# Altium PCB Urukul.PcbDoc (part 14 of 15)
Units mm, origin at the board's own origin, x right, y up, seen from the top; angles counter-clockwise.
Board outline 161.99 x 100 mm, 6 copper layers (L1, L2, L3, L4, P5, L6), stack 1.548 mm thick; 1078 components, 609 nets, 3798 pads, 2552 vias.
Unrouted connection lines stored in the file: 1.
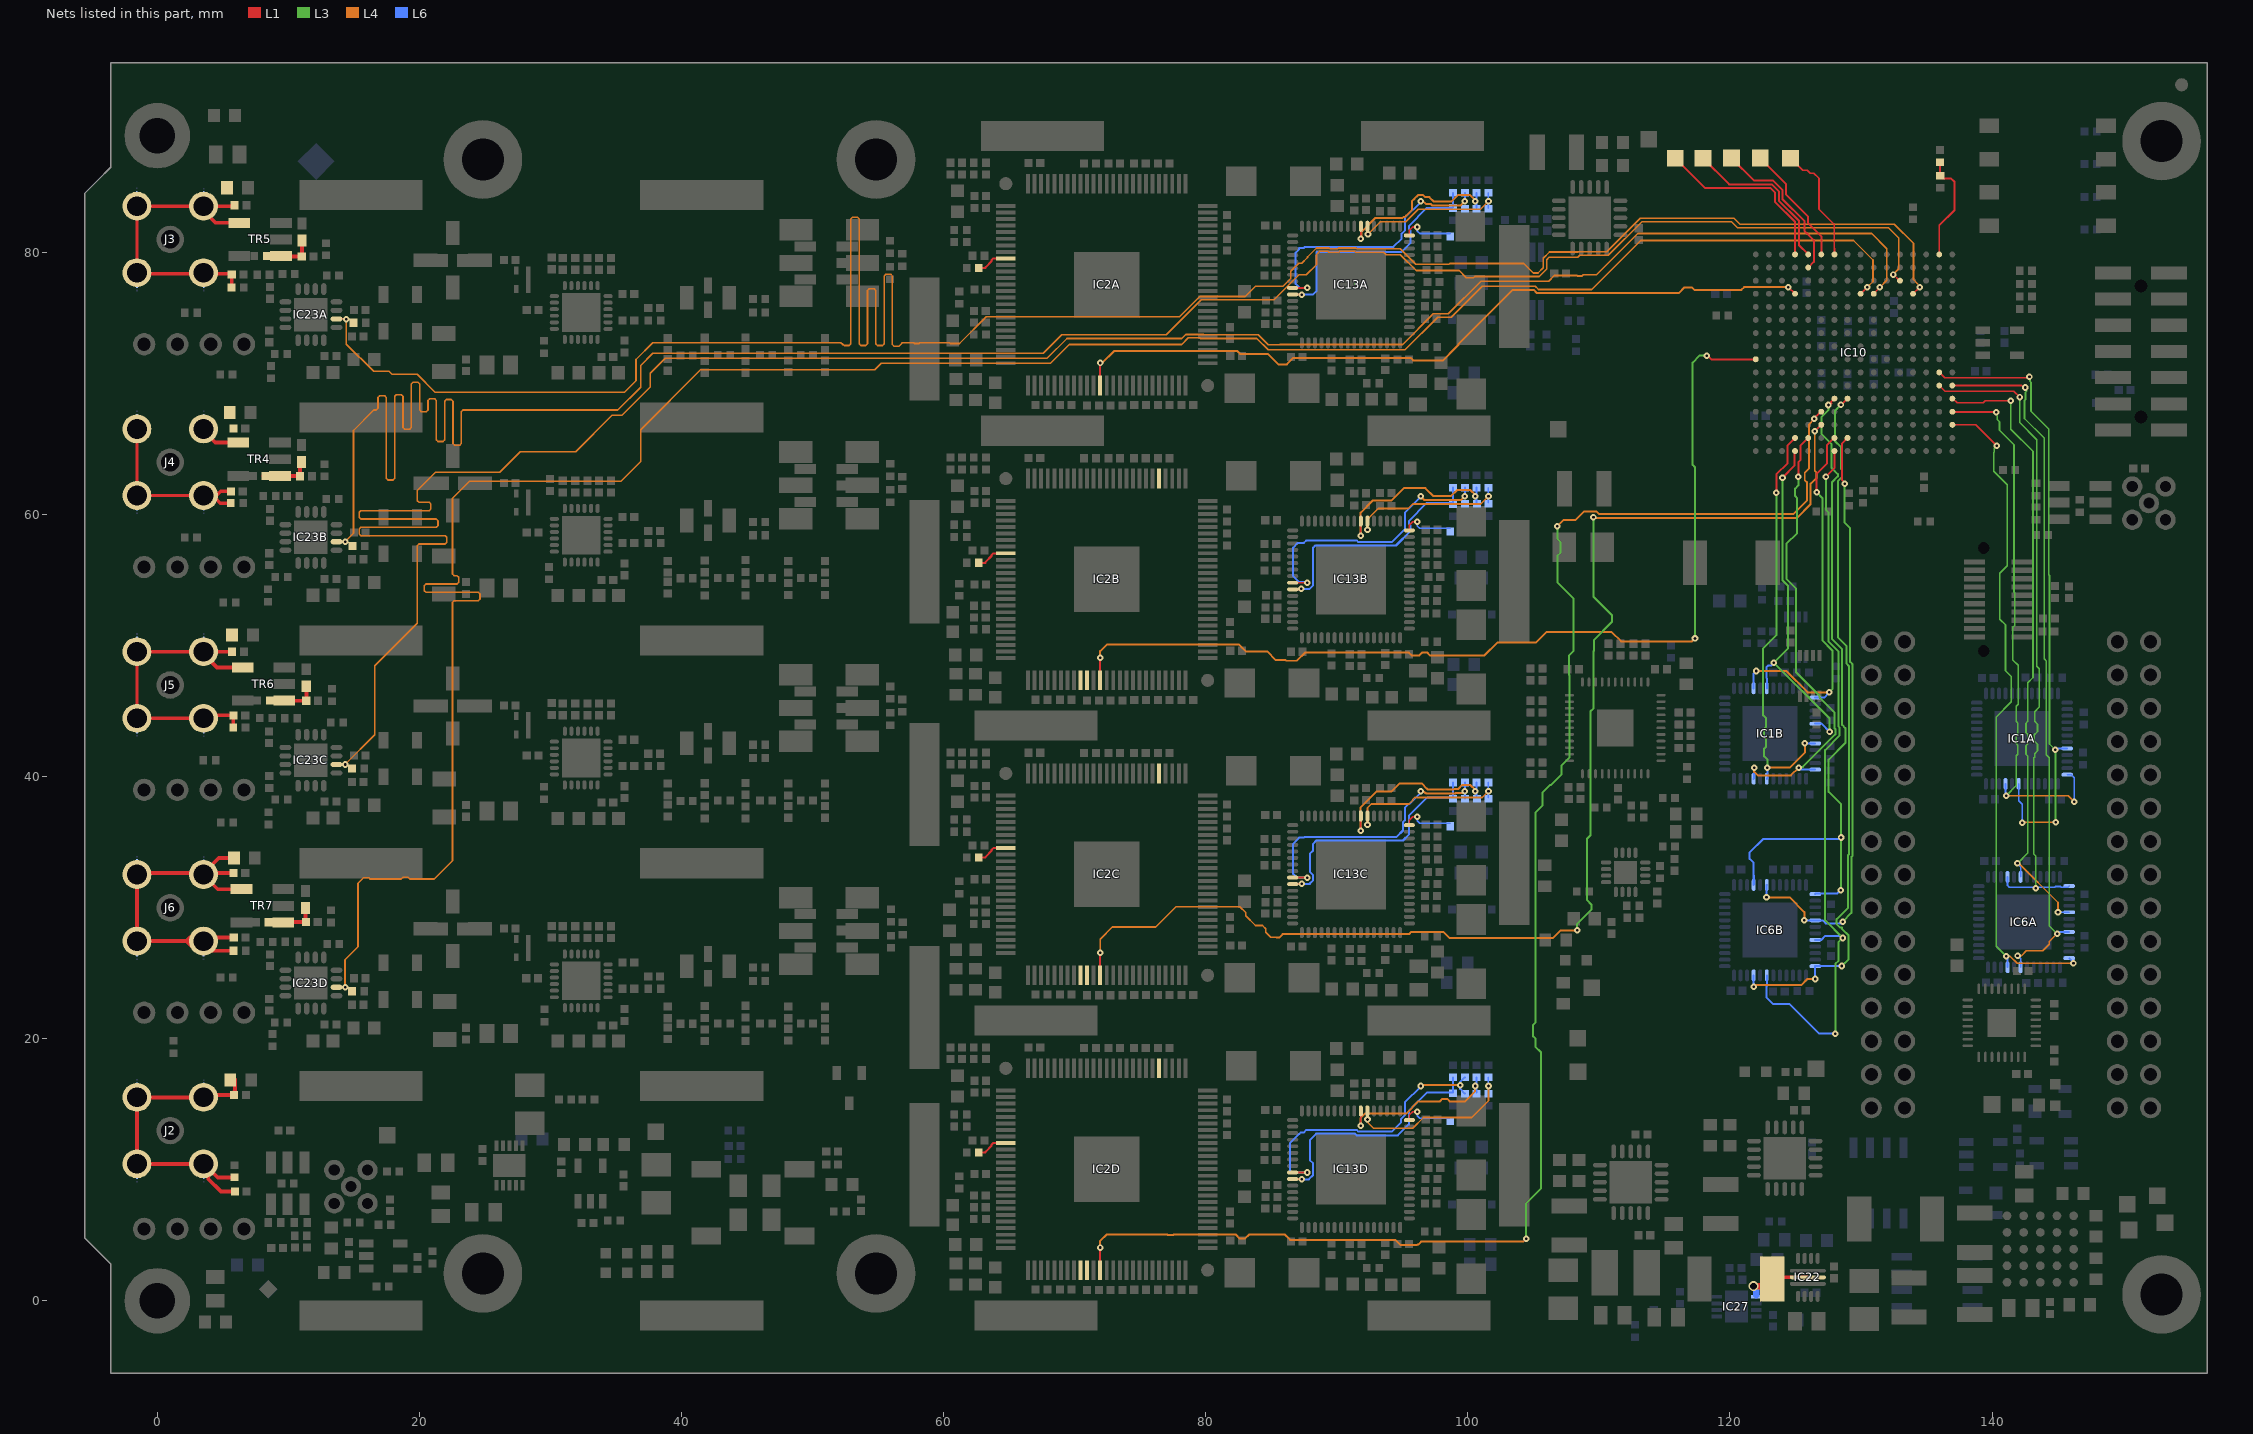
[diagram p16: the nets of this part, all layers, seen from the top]

## Via types
v1: diameter 0.5, hole 0.2, L1 to L6, tented both sides, 1964 vias
v2: diameter 0.5, hole 0.2, L1 to L6, 480 vias
v3: diameter 0.6, hole 0.3, L1 to L6, tented both sides, 52 vias
v4: diameter 0.6, hole 0.3, L1 to L6, 36 vias
v5: diameter 0.762, hole 0.508, L1 to L6, tented both sides, 20 vias

## Nets (pads, with @x,y where several pads share a name; then routed paths per layer and width w, separated by ;. In a path a pad name is that pad's centre, name@x,y a point inside that pad or via, vN(x,y) a via of type N, cw(c..) or ccw(c..) an arc to the next point about the centre after c; other vN are vias at no path point) (continued)
R\E\_DE2: IC1A.8 IC1A.19 IC10.K15 | length 48.5
  L1 w0.127: IC10.K15@135.97,70.841 136.386,70.425 142.679,70.425 142.752,70.498 v1(142.853,70.498)
  L3 w0.127: v1(142.853,70.498) 142.889,70.462 142.889,70.165 142.974,70.08 142.974,67.88 144.329,66.526 144.329,55.391 144.381,55.338 144.381,42.489 144.84,42.029 144.84,36.539 v1(144.859,36.52)
  L4 w0.127: v1(142.294,36.488) 142.326,36.52 v1(144.859,36.52)
  L6 w0.127: IC1A.19@142.031,39.446 142.031,38.156 142.294,37.893 v1(142.294,36.488) ; v1(144.821,42.048) 144.919,42.146 IC1A.8@145.731,42.146
R\E\_DE3: IC1A.12 IC1A.21 IC10.N16 | length 42.8
  L1 w0.127: IC10.N16@136.97,67.841 136.995,67.816 140.295,67.816 v1(140.321,67.79)
  L3 w0.127: v1(140.321,67.79) 140.389,67.722 140.389,67.254 140.572,67.071 140.572,66.433 141.672,65.333 141.672,54.075 141.726,54.021 141.726,51.525 141.59,51.389 141.59,48.893 141.996,48.487 141.996,45.515 141.841,45.36 141.841,44.213 141.972,44.082 141.972,43.273 141.841,43.142 141.841,42.523 141.972,42.392 141.972,41.709 141.841,41.578 141.841,39.318 v1(141.071,38.548)
  L4 w0.127: v1(141.071,38.548) 145.804,38.548 v1(146.281,38.071)
  L6 w0.127: IC1A.21@141.031,39.446 141.031,38.588 v1(141.071,38.548) ; IC1A.12@145.731,40.146 146.056,40.146 146.281,39.921 v1(146.281,38.071)
R\E\_DE4: IC6A.1 IC6A.40 IC10.L15 | length 50.7
  L1 w0.127: IC10.L15@135.97,69.841 136.406,69.405 141.659,69.405 v1(142.105,68.96)
  L3 w0.127: v1(142.105,68.96) 142.105,67.017 143.42,65.701 143.42,48.421 143.602,48.239 143.602,45.311 143.246,44.955 143.246,44.213 143.472,43.987 143.472,43.434 143.225,43.187 143.225,42.713 143.472,42.466 143.472,41.963 143.246,41.737 143.246,41.483 143.191,41.428 143.191,34.088 143.335,33.944 v1(143.335,31.465)
  L6 w0.127: IC6A.40@141.181,32.346 141.181,31.683 141.186,31.683 141.321,31.548 v1@143.321,31.548 ; v1@143.335,31.548 144.776,31.548 144.839,31.611 145.224,31.611 145.287,31.548 145.784,31.548 IC6A.1@145.881,31.646
R\E\_DE5: IC6A.5 IC6A.42 IC10.M16 | length 48.5
  L1 w0.127: IC10.M16@136.97,68.841 137.018,68.841 137.34,68.52 139.318,68.52 139.48,68.681 v1(141.43,68.681)
  L3 w0.127: v1(141.43,68.681) 141.43,66.514 143.123,64.822 143.123,47.556 142.721,47.154 142.721,45.311 ; v1(141.938,33.396) 141.954,33.396 142.734,34.176 142.734,41.566 142.591,41.709 142.591,42.36 142.722,42.491 142.722,43.221 142.591,43.352 142.591,44.082 142.722,44.213 142.722,45.311
  L4 w0.127: v1(141.938,33.396) 142.028,33.396 145.031,30.392 v1(145.031,29.646)
  L6 w0.127: v1(141.938,33.396) 141.938,33.345 142.181,33.102 IC6A.42@142.181,32.346 ; v1(145.031,29.646) IC6A.5@145.881,29.646
R\E\_DE6: IC6A.8 IC6A.19 IC10.L16 | length 54.3
  L1 w0.127: IC10.L16@136.97,69.841 142.278,69.841 142.43,69.688 v1(142.531,69.688)
  L3 w0.127: v1(142.531,69.688) 142.531,69.587 142.64,69.479 142.64,69.433 142.545,69.338 142.545,68.778 142.472,68.704 142.472,67.329 143.97,65.83 143.97,48.979 144.127,48.823 144.127,41.673 144.372,41.428 144.372,28.594 v1(144.96,28.006)
  L4 w0.127: v1(141.944,26.341) 142.251,26.341 142.617,26.708 143.866,26.708 144.372,27.213 144.372,27.418 v1(144.96,28.006)
  L6 w0.127: v1(141.944,26.341) 142.181,26.103 IC6A.19@142.181,25.446 ; v1(144.96,28.006) 144.96,28.035 145.071,28.146 IC6A.8@145.881,28.146
R\E\_DE7: IC6A.12 IC6A.21 IC10.P16 | length 51.7
  L1 w0.127: IC10.P16@136.97,66.841 138.745,66.841 v1(140.346,65.24)
  L3 w0.127: v1(140.346,65.24) 140.169,65.064 140.169,64.769 140.123,64.723 140.123,63.306 141.164,62.265 141.164,56.083 140.591,55.51 140.591,52.012 141.026,51.577 141.026,48.078 141.472,47.632 141.472,45.709 140.316,44.553 140.316,27.054 v1(141.071,26.298)
  L4 w0.127: v1(141.071,26.298) 141.363,26.298 141.914,25.748 146.202,25.748 v1(146.21,25.756)
  L6 w0.127: v1(141.071,26.298) 141.181,26.188 IC6A.21@141.181,25.446 ; IC6A.12@145.881,26.146 146.21,25.817 v1(146.21,25.756)
R\E\_DE8: IC1B.1 IC1B.40 IC10.R7 | length 29.5
  L1 w0.152: v1(126.613,61.689) 126.613,63.093 127.398,63.878 127.398,65.269 IC10.R7@127.97,65.841
  L3 w0.152: v1(126.613,61.689) 127.046,61.256 127.046,60.241 127.051,60.236 127.051,50.391 127.821,49.621 127.821,46.671 v1(127.583,46.432)
  L4 w0.152: v1(122.008,48.057) 124.305,48.057 125.93,46.432 v1(127.583,46.432)
  L6 w0.152: IC1B.40@121.808,46.732 121.808,47.857 v1(122.008,48.057) ; IC1B.1@126.508,46.032 127.183,46.032 v1(127.583,46.432)
R\E\_DE9: IC1B.5 IC1B.42 IC10.T4 | length 27.9
  L1 w0.152: v1(124.01,62.811) 124.94,63.742 124.94,64.811 IC10.T4@124.97,64.841
  L3 w0.152: v1(124.01,62.811) 124.01,54.994 124.423,54.58 124.423,49.76 v1(123.348,48.685) 127.598,44.435 v1(127.598,43.435)
  L6 w0.152: IC1B.42@122.808,46.732 122.808,47.489 122.77,47.527 122.77,48.336 122.903,48.47 123.133,48.47 v1(123.348,48.685) ; IC1B.5@126.508,44.032 127,44.032 v1(127.598,43.435)
R\E\_DE10: IC1B.8 IC1B.19 IC10.R4 | length 32.2
  L1 w0.152: v1(123.545,61.648) 123.545,63.066 124.398,63.919 124.398,65.269 IC10.R4@124.97,65.841
  L3 w0.152: v1(122.848,40.685) 122.848,41.307 122.605,41.55 122.605,42.139 122.761,42.295 122.761,42.845 122.605,43.001 122.605,43.641 122.761,43.798 122.761,44.438 122.533,44.666 122.533,49.781 123.545,50.793 v1(123.545,61.648)
  L4 w0.152: v1(122.848,40.685) 124.564,40.685 125.708,41.828 v1(125.708,42.54)
  L6 w0.152: IC1B.19@122.808,39.832 122.848,39.872 v1(122.848,40.685) ; v1@125.75,42.532 IC1B.8@126.508,42.532
R\E\_DE11: IC1B.12 IC1B.21 IC10.R5 | length 35.1
  L1 w0.152: v1(125.22,62.89) 125.22,63.997 125.398,64.175 125.398,65.269 IC10.R5@125.97,65.841
  L3 w0.152: v1(125.22,62.89) 125.22,62.229 124.967,61.976 124.967,61.409 125.123,61.253 125.123,58.583 124.305,57.764 124.305,55.094 125.055,54.344 125.055,47.942 126.845,46.151 126.845,46.032 127.994,44.883 127.994,43.679 128.051,43.622 128.051,43.228 125.566,40.742 125.308,40.742 v1(125.251,40.685)
  L4 w0.152: v1(121.848,40.685) 121.848,40.366 122.125,40.088 124.653,40.088 v1(125.251,40.685)
  L6 w0.152: IC1B.21@121.808,39.832 121.848,39.872 v1(121.848,40.685) ; v1(125.251,40.685) 125.404,40.532 IC1B.12@126.508,40.532
R\E\_DE12: IC6B.1 IC6B.40 IC10.M7 | length 53.1
  L1 w0.152: v1@127.73,68.476 127.607,68.353 v1(127.515,68.353) 127.515,68.37 127.97,68.824 IC10.M7@127.97,68.841
  L3 w0.152: v1(127.515,68.353) 127.515,67.965 126.968,67.417 126.968,66.153 127.766,65.355 127.766,63.548 128.231,63.082 128.231,62.917 127.795,62.48 127.795,50.486 128.556,49.725 128.556,43.944 128.803,43.697 128.803,42.561 127.537,41.295 127.537,38.831 128.476,37.891 v1(128.476,35.351) 128.476,31.364 v1(128.451,31.338)
  L6 w0.152: IC6B.1@126.508,31.032 126.56,31.084 128.197,31.084 v1(128.451,31.338) ; v1(128.476,35.351) 128.364,35.239 122.524,35.239 121.505,34.22 121.505,33.73 121.808,33.427 121.808,32.475 ; 121.808,32.475 IC6B.40@121.808,31.732 121.848,31.772 121.848,32.435 121.808,32.475
R\E\_DE13: IC6B.5 IC6B.42 IC10.R8 | length 45.7
  L1 w0.152: v1(128.745,62.34) 128.745,62.434 128.542,62.637 128.542,65.413 IC10.R8@128.97,65.841
  L3 w0.152: v1(128.598,28.935) 129.268,29.605 129.268,33.863 129.361,33.956 129.361,48.551 129.163,48.75 129.163,58.959 128.745,59.377 v1(128.745,62.34)
  L4 w0.152: v1(122.787,30.779) 124.565,30.779 125.682,29.662 v1(125.682,29.052)
  L6 w0.152: v1(122.787,30.779) 122.787,31.711 IC6B.42@122.808,31.732 ; v1(125.682,29.052) 125.703,29.032 IC6B.5@126.508,29.032 127.065,29.032 127.303,28.794 128.457,28.794 v1(128.598,28.935)
R\E\_DE14: IC6B.8 IC6B.19 IC10.T7 | length 56.8
  L1 w0.152: v1(127.325,62.89) 127.97,63.535 IC10.T7@127.97,64.841
  L3 w0.152: v1(127.325,62.89) 127.325,60.357 127.515,60.167 127.515,50.322 128.276,49.561 128.276,43.828 128.356,43.749 128.356,43.121 127.257,42.022 127.257,29.025 v1(128.598,27.685) 128.299,27.385 128.299,25.959 128.045,25.705 v1(128.045,20.387)
  L6 w0.152: IC6B.19@122.808,24.832 122.808,24.039 122.77,24.001 122.77,23.147 123.265,22.651 124.539,22.651 126.804,20.387 v1(128.045,20.387) ; IC6B.8@126.508,27.532 126.965,27.532 127.278,27.845 128.437,27.845 v1(128.598,27.685)
R\E\_DE15: IC6B.12 IC6B.21 IC10.M8 | length 54.3
  L1 w0.152: v1(128.47,68.363) 128.481,68.363 128.959,68.841 IC10.M8@128.97,68.841
  L3 w0.152: v1(128.47,68.363) 128.017,67.91 128.017,65.582 128.476,65.122 128.476,63.471 128.535,63.412 128.535,62.826 128.238,62.528 128.238,50.627 128.883,49.981 128.883,48.634 129.082,48.435 129.082,34.072 128.988,33.978 128.988,29.966 128.145,29.122 128.145,28.747 128.41,28.481 128.565,28.481 128.565,28.359 129.051,27.872 129.051,26.071 v1(128.527,25.547)
  L4 w0.152: v1(121.822,23.972) 121.941,24.092 125.432,24.092 125.897,24.556 v1(126.521,24.556)
  L6 w0.152: IC6B.21@121.808,24.832 121.808,23.975 v1@121.848,23.935 ; v1@126.508,24.556 IC6B.12@126.508,25.532 v1@128.527,25.532
RF_OUT0: C50A.2 D2A.2 R180.2 R192A.2 TR5.3 | length 4
  L1 w0.298: R180.2@8.339,79.731 8.389,79.68 TR5.3@9.44,79.68 ; TR5.3@9.44,79.718 9.478,79.68 C50A.2@11.019,79.68 11.044,79.705 D2A.2@11.044,80.913
RF_OUT1: C50B.2 D2B.2 R179.2 R192B.2 TR4.3 | length 3.9
  L1 w0.298: R179.2@8.108,62.943 TR4.3@9.359,62.943 10.864,62.943 C50B.2@10.894,62.913 10.894,63.899 D2B.2@10.999,64.004
RF_OUT2: C50C.2 D2C.2 R181.2 R192C.2 TR6.3 | length 3.9
  L1 w0.298: R181.2@8.578,45.793 8.583,45.788 R192C.2@11.349,45.788 C50C.2@11.369,45.788 D2C.2@11.369,46.891
RF_OUT3: C50D.2 D2D.2 R182.2 R192D.2 TR7.3 | length 3.9
  L1 w0.298: R182.2@8.481,28.881 8.513,28.913 R192D.2@11.324,28.913 C50D.2@11.344,28.913 11.319,28.938 D2D.2@11.319,29.963
RFSW_CTRL0: IC10.D13 IC23A.2 R20A.2 | length 176.2
  L1 w0.127: IC23A.2@13.673,74.924 14.408,74.924 v1(14.427,74.905) ; IC10.D13@133.97,76.841 133.97,76.846 134.47,77.346 v1(134.47,77.35)
  L4 w0.127: v1(14.427,74.905) 14.427,73 16.51,70.917 17.678,70.917 17.907,70.688 19.837,70.688 21.191,69.335 35.654,69.335 36.525,70.206 36.525,71.831 37.795,73.101 39.694,73.101 40.257,73.101 ; 39.976,73.101 40.257,73.101 ; 52.282,72.974 52.155,73.101 50.401,73.101 40.257,73.101 ; 52.282,72.985 52.282,73.012 ; 52.282,73.022 52.409,72.895 52.79,72.895 52.917,73.022 52.917,73.101 52.917,82.548 53.044,82.675 53.425,82.675 53.552,82.548 53.552,73.101 53.552,73.022 53.679,72.895 54.06,72.895 54.187,73.022 54.187,73.101 54.187,77.088 54.314,77.215 54.695,77.215 54.822,77.088 54.822,73.101 54.822,73.022 54.949,72.895 55.33,72.895 55.457,73.022 55.457,73.101 55.457,78.196 55.584,78.323 55.965,78.323 56.092,78.196 56.092,73.101 56.092,72.974 56.219,72.847 56.6,72.847 56.727,72.974 56.854,73.101 57.044,73.101 57.163,73.101 57.708,73.101 57.762,73.048 58.126,73.048 58.18,73.101 60.447,73.101 60.501,73.048 61.211,73.048 63.246,75.082 78,75.082 79.549,76.632 83.007,76.632 83.799,77.423 85.899,77.423 86.487,78.012 86.487,78.562 87.103,79.179 87.332,79.179 87.759,79.606 87.759,79.648 88.446,80.335 89.424,80.335 89.483,80.276 90.059,80.276 90.118,80.335 91.478,80.335 91.539,80.274 94.846,80.274 96.033,79.087 98.557,79.087 98.616,79.146 104.275,79.146 104.99,78.432 105.355,78.432 105.756,78.833 105.756,79.547 106.232,80.023 108.408,80.023 108.421,80.035 110.598,80.035 113.164,82.602 120.303,82.602 120.765,82.14 132.548,82.14 133.999,80.689 133.999,77.924 134.337,77.586
RFSW_CTRL1: IC10.C12 IC23B.2 R20B.2 | length 175.5
  L1 w0.127: v1(132.458,78.309) 132.48,78.309 132.948,77.841 IC10.C12@132.97,77.841
  L4 w0.127: v1(14.327,57.924) 14.969,58.566 14.969,66.413 16.526,67.97 16.717,67.97 16.844,68.097 16.844,68.923 16.971,69.05 17.352,69.05 17.479,68.923 17.479,67.97 17.479,62.756 17.606,62.629 17.987,62.629 18.114,62.756 18.114,67.97 18.114,69.02 18.241,69.147 18.622,69.147 18.749,69.02 18.749,67.97 18.749,66.642 18.876,66.515 19.257,66.515 19.384,66.642 19.384,67.97 19.384,69.961 19.511,70.088 19.892,70.088 20.019,69.961 20.019,67.97 20.146,67.843 20.527,67.843 20.654,67.97 20.654,68.696 20.781,68.823 21.162,68.823 21.289,68.696 21.289,67.97 21.289,65.692 21.416,65.565 21.797,65.565 21.924,65.692 21.924,67.97 21.924,68.648 22.051,68.775 22.432,68.775 22.559,68.648 22.559,67.97 22.559,65.418 22.686,65.291 23.067,65.291 23.194,65.418 23.194,67.843 23.321,67.97 25.357,67.97 35.143,67.97 36.881,69.708 36.881,71.374 37.798,72.291 67.597,72.291 69.017,73.711 76.987,73.711 79.654,76.378 85.212,76.378 87.117,78.283 87.664,78.283 88.446,79.065 88.446,79.827 88.7,80.081 89.319,80.081 89.378,80.022 90.164,80.022 90.223,80.081 91.373,80.081 91.433,80.02 93.587,80.02 93.78,79.827 94.852,79.827 96.066,78.613 99.343,78.613 99.885,78.071 100.436,78.071 100.521,78.156 105.438,78.156 106.01,78.728 106.01,79.442 106.197,79.629 108.382,79.629 108.534,79.781 110.718,79.781 113.285,82.348 120.116,82.348 120.577,81.886 132.093,81.886 132.888,81.091 132.888,78.755 132.458,78.324 v1(132.458,78.309)
RFSW_CTRL2: IC10.D10 IC23C.2 R20C.2 | length 175.6
  L1 w0.127: IC10.D10@130.97,76.841 130.97,76.859 131.444,77.333 v1(131.444,77.35)
  L4 w0.127: v1(14.327,40.924) 16.586,43.183 16.586,48.449 19.837,51.7 19.837,54.216 19.837,57.62 19.964,57.747 21.963,57.747 22.09,57.874 22.09,58.255 21.963,58.382 19.837,58.382 15.535,58.382 15.408,58.509 15.408,58.89 15.535,59.017 19.837,59.017 21.295,59.017 21.422,59.144 21.422,59.525 21.295,59.652 19.837,59.652 15.535,59.652 15.408,59.779 15.408,60.16 15.535,60.287 19.837,60.287 20.75,60.287 20.877,60.414 20.877,60.795 20.75,60.922 19.964,60.922 19.837,61.049 19.837,61.239 19.837,61.83 21.228,63.221 26.124,63.221 27.694,64.791 31.923,64.791 34.696,67.564 35.458,67.564 37.617,69.723 37.617,70.764 38.763,71.91 67.892,71.91 69.413,73.431 78.174,73.431 78.475,73.733 79.859,73.733 79.886,73.705 84.001,73.705 84.759,72.948 85.626,72.948 85.648,72.969 95.025,72.969 97.361,75.306 98.504,75.306 100.999,77.8 106.169,77.8 106.601,78.232 108.327,78.232 108.362,78.198 108.726,78.198 108.815,78.286 109.813,78.286 112.966,81.44 130.808,81.44 131.971,80.277 131.971,77.877 v1(131.444,77.35)
RFSW_CTRL3: IC10.D9 IC23D.2 R20D.2 | length 175.5
  L1 w0.127: IC10.D9@129.97,76.841 129.972,76.841 130.468,77.337 v1(130.47,77.337)
  L4 w0.127: v1(14.327,23.924) 14.327,26.032 15.316,27.022 15.316,31.86 15.734,32.279 16.126,32.279 16.223,32.182 18.615,32.182 18.762,32.329 19.126,32.329 19.273,32.182 21.133,32.182 22.53,33.579 22.53,51.966 22.53,53.302 22.657,53.429 24.501,53.429 24.628,53.556 24.628,53.937 24.501,54.064 22.53,54.064 20.504,54.064 20.377,54.191 20.377,54.572 20.504,54.699 22.53,54.699 22.865,54.699 22.992,54.826 22.992,55.207 22.865,55.334 22.657,55.334 22.53,55.461 22.53,55.651 22.53,61.239 23.825,62.535 35.382,62.535 36.884,64.037 36.884,66.475 41.45,71.041 54.749,71.041 55.237,71.529 68.15,71.529 69.596,72.974 78.157,72.974 78.662,73.479 79.536,73.479 79.589,73.426 83.899,73.426 84.763,72.562 95.202,72.562 97.692,75.052 98.733,75.052 101.089,77.407 105.143,77.407 105.388,77.162 109.443,77.162 113.187,80.906 129.429,80.906 130.911,79.425 130.911,77.778 v1(130.47,77.337)
RSET1A: IC2A.84 R112A.1 | length 2.4
  L1 w0.152: R112A.1@62.689,78.813 63.199,78.813 63.199,78.881 63.652,79.334 63.652,79.399 63.794,79.541 IC2A.84@64.744,79.541
RSET1B: IC2B.84 R112B.1 | length 2.4
  L1 w0.152: R112B.1@62.689,56.313 63.199,56.313 63.199,56.381 63.652,56.834 63.652,56.899 63.794,57.041 IC2B.84@64.744,57.041
RSET1C: IC2C.84 R112C.1 | length 2.4
  L1 w0.152: R112C.1@62.689,33.813 63.199,33.813 63.199,33.881 63.652,34.334 63.652,34.399 63.794,34.541 IC2C.84@64.744,34.541
RSET1D: IC2D.84 R112D.1 | length 2.4
  L1 w0.152: R112D.1@62.689,11.313 63.199,11.313 63.199,11.381 63.652,11.834 63.652,11.899 63.794,12.041 IC2D.84@64.744,12.041
RSETA: IC13A.48 R15A.1 | length 4
  L1 w0.127: IC13A.48@95.534,81.291 95.534,81.678 95.791,81.935 v1(96.139,81.935)
  L6 w0.127: v1(96.139,81.935) 96.139,81.619 96.319,81.438 R15A.1@98.649,81.438
RSETB: IC13B.48 R15B.1 | length 4
  L1 w0.127: IC13B.48@95.534,58.791 95.534,59.178 95.791,59.435 v1(96.139,59.435)
  L6 w0.127: v1(96.139,59.435) 96.139,59.119 96.319,58.938 R15B.1@98.649,58.938
RSETC: IC13C.48 R15C.1 | length 4
  L1 w0.127: IC13C.48@95.534,36.291 95.534,36.678 95.791,36.935 v1(96.139,36.935)
  L6 w0.127: v1(96.139,36.935) 96.139,36.619 96.319,36.438 R15C.1@98.649,36.438
RSETD: IC13D.48 R15D.1 | length 4
  L1 w0.127: IC13D.48@95.534,13.791 95.534,14.178 95.791,14.435 v1(96.139,14.435)
  L6 w0.127: v1(96.139,14.435) 96.139,14.119 96.319,13.938 R15D.1@98.649,13.938
S1A: IC13A.9 R96A.1 R104A.2 | length 20.9
  L1 w0.152: IC13A.9@86.634,77.291 87.741,77.291 v1(87.744,77.288)
  L4 w0.152: v1(96.393,83.891) 96.494,83.992 96.792,83.694 97.15,83.694 97.266,83.579 98.773,83.579 98.784,83.59 99.468,83.59 v1(99.769,83.891)
  L6 w0.152: v1(87.744,77.288) 87.178,77.288 86.866,77.601 86.866,79.976 87.106,80.216 87.106,80.335 87.482,80.335 87.566,80.419 94.322,80.419 94.944,81.041 94.944,81.423 95.187,81.666 95.187,82.634 96.393,83.84 v1(96.393,83.891) ; v1(99.769,83.891) R104A.2@99.769,84.548
S1B: IC13B.9 R96B.1 R104B.2 | length 21.1
  L1 w0.152: IC13B.9@86.634,54.791 87.741,54.791 v1(87.744,54.788)
  L4 w0.152: v1(96.393,61.391) 96.693,61.09 99.468,61.09 v1(99.769,61.391)
  L6 w0.152: v1(87.744,54.788) 87.697,54.835 87.131,54.835 86.668,55.299 86.668,57.475 87.028,57.835 87.482,57.835 87.654,58.008 91.534,58.008 91.631,57.91 94.224,57.91 95.187,58.873 95.187,60.134 96.393,61.34 v1(96.393,61.391) ; v1(99.769,61.391) R104B.2@99.769,62.048
S1C: IC13C.9 R96C.1 R104C.2 | length 21.9
  L1 w0.152: IC13C.9@86.634,32.291 87.741,32.291 v1(87.744,32.288)
  L4 w0.152: v1(96.393,38.891) 96.494,38.992 96.738,38.748 96.781,38.748 96.832,38.697 99.027,38.697 99.078,38.748 99.627,38.748 v1(99.769,38.891)
  L6 w0.152: v1(87.744,32.288) 86.963,32.288 86.668,32.583 86.668,34.869 87.134,35.335 87.482,35.335 87.548,35.402 94.567,35.402 95.05,35.885 95.05,36.529 95.187,36.666 95.187,37.634 95.443,37.89 95.52,37.89 96.393,38.763 v1(96.393,38.891) ; R104C.2@99.769,39.548 v1(99.769,38.891) 99.771,38.889 R96C.1@99.771,38.316
S1D: IC13D.9 R96D.1 R104D.2 | length 21.8
  L1 w0.152: IC13D.9@86.634,9.791 87.741,9.791 v1(87.744,9.788)
  L4 w0.152: v1(96.393,16.391) 96.456,16.454 v1(99.419,16.454)
  L6 w0.152: v1(87.744,9.788) 86.603,9.788 86.414,9.977 86.414,12.024 87.131,12.741 87.146,12.741 87.24,12.835 87.482,12.835 87.682,13.035 91.506,13.035 91.631,12.91 94.206,12.91 94.904,13.608 94.904,13.883 95.187,14.166 95.187,15.134 96.393,16.34 v1(96.393,16.391) ; R104D.2@99.769,17.048 99.419,16.698 v1(99.419,16.454) 99.419,16.164 R96D.1@99.771,15.812
S2A: IC13A.10 R97A.1 R105A.2 | length 19
  L1 w0.152: IC13A.10@86.634,76.791 87.326,76.791 87.391,76.791 87.349,76.748 87.346,76.746 87.326,76.766 v1(87.326,76.771)
  L3 w0.152: v1@87.326,76.747 v1(87.326,76.771)
  L6 w0.152: v1(87.326,76.771) 88.174,76.771 88.444,77.041 88.444,80.041 94.944,80.041 95.63,80.727 95.63,81.653 95.491,81.792 95.491,81.999 96.881,83.388 R97A.1@98.869,83.388 R105A.2@98.869,84.548
S2B: IC13B.10 R97B.1 R105B.2 | length 18.8
  L1 w0.152: IC13B.10@86.634,54.291 87.3,54.291 v1@87.301,54.291 ; v1(87.3,54.331) 87.3,54.292 v1@87.301,54.291 ; v1@87.301,54.291 87.346,54.246 87.365,54.265 87.391,54.291 v1@87.301,54.291
  L3 w0.152: v1(87.3,54.331) 87.3,54.273 v1@87.327,54.246
  L6 w0.152: v1(87.3,54.331) 87.927,54.331 88.197,54.601 88.197,54.976 88.192,54.981 88.192,57.475 88.348,57.631 94.516,57.631 95.63,58.745 95.63,59.153 95.491,59.292 95.491,59.499 96.881,60.888 98.857,60.888 98.869,60.888 R105B.2@98.869,62.048
S2C: IC13C.10 R97C.1 R105C.2 | length 19.1
  L1 w0.152: IC13C.10@86.634,31.791 v1@87.323,31.791 ; v1(87.323,31.822) v1@87.323,31.791 ; v1@87.323,31.791 87.323,31.769 87.346,31.746 87.373,31.772 87.391,31.791 v1@87.323,31.791
  L3 w0.152: v1(87.323,31.822) 87.323,31.749 v1@87.327,31.746
  L6 w0.152: v1(87.323,31.822) 87.938,31.822 87.938,31.842 88.197,32.101 88.197,32.476 87.938,32.735 87.938,34.107 88.192,34.361 88.192,34.869 88.446,35.123 95.05,35.123 95.491,35.564 95.491,36.999 96.881,38.388 98.857,38.388 98.869,38.388 R105C.2@98.869,39.548
S2D: IC13D.10 R97D.1 R105D.2 | length 19
  L1 w0.152: IC13D.10@86.634,9.291 87.326,9.291 87.391,9.291 87.349,9.248 87.346,9.246 87.326,9.266 v1(87.326,9.271)
  L3 w0.152: v1@87.326,9.247 v1(87.326,9.271)
  L6 w0.152: v1(87.326,9.271) 87.867,9.271 88.197,9.601 88.197,9.976 88.194,9.979 88.194,10.483 87.938,10.739 87.938,12.263 88.431,12.756 91.391,12.756 91.516,12.631 94.656,12.631 95.491,13.466 95.491,14.499 96.881,15.888 98.857,15.888 98.869,15.888 R105D.2@98.869,17.048
S3A: IC13A.54 R98A.1 R106A.2 | length 12
  L1 w0.127: IC13A.54@92.334,81.991 92.379,81.945 v1(92.379,81.381)
  L4 w0.127: v1(92.379,81.381) 93.328,82.33 95.259,82.33 96.217,83.288 100.971,83.288 v1(101.574,83.891)
  L6 w0.127: R98A.1@101.569,83.388 v1@101.569,83.891 ; R106A.2@101.569,84.548 101.569,83.967 101.574,83.962 v1(101.574,83.891)
S3B: IC13B.54 R98B.1 R106B.2 | length 12.6
  L1 w0.127: IC13B.54@92.334,59.491 92.344,59.481 v1(92.344,58.838)
  L4 w0.127: v1(92.344,58.838) 92.344,59.638 93.166,60.46 95.449,60.46 95.788,60.799 100.982,60.799 v1(101.574,61.391)
  L6 w0.127: R98B.1@101.569,60.888 v1@101.569,61.391 ; R106B.2@101.569,62.048 101.569,61.467 101.574,61.462 v1(101.574,61.391)
S3C: IC13C.54 R98C.1 R106C.2 | length 12.9
  L1 w0.127: IC13C.54@92.334,36.991 92.344,36.981 v1(92.344,36.338)
  L4 w0.127: v1(92.344,36.338) 92.344,37.611 92.636,37.902 95.515,37.902 95.788,38.175 95.788,38.251 95.942,38.406 101.089,38.406 v1(101.574,38.891)
  L6 w0.127: R98C.1@101.569,38.388 v1@101.569,38.891 ; R106C.2@101.569,39.548 101.569,38.967 101.574,38.962 v1(101.574,38.891)
S3D: IC13D.54 R98D.1 R106D.2 | length 13.5
  L1 w0.127: IC13D.54@92.334,14.491 92.344,14.481 v1(92.344,13.838)
  L4 w0.127: v1(92.344,13.838) 92.344,13.613 92.794,13.163 95.794,13.163 96.62,13.99 100.295,13.99 101.574,15.268 v1(101.574,16.391)
  L6 w0.127: R98D.1@101.569,15.888 v1@101.569,16.391 ; R106D.2@101.569,17.048 101.569,16.467 101.574,16.462 v1(101.574,16.391)
S4A: IC13A.55 R99A.1 R107A.2 | length 14.3
  L1 w0.127: v1(91.824,81.046) v1@91.834,81.036 ; IC13A.55@91.834,81.991 91.834,81.046 v1@91.834,81.036 ; v1@91.834,81.036 91.834,80.878 91.84,80.873 91.84,81.031 v1@91.834,81.036
  L4 w0.152: v1(91.824,81.046) 91.824,80.971 91.901,80.893 91.901,81.046 91.901,81.579 92.944,82.621 94.997,82.621 95.072,82.696 95.196,82.696 95.317,82.817 95.334,82.817 95.736,83.218 95.736,83.893 95.915,84.072 95.915,84.089 96.195,84.369 96.591,84.369 96.745,84.215 97.06,84.215 97.392,83.883 98.647,83.883 98.658,83.894 98.76,83.894 99.234,84.369 100.182,84.369 100.558,83.992 v1(100.558,83.891)
  L6 w0.152: v1(100.558,83.891) 100.567,83.891 100.669,83.992 R107A.2@100.669,84.548 ; R99A.1@100.669,83.388 v1@100.669,83.891
S4B: IC13B.55 R99B.1 R107B.2 | length 14.4
  L1 w0.127: v1(91.819,58.363) 91.834,58.378 IC13B.55@91.834,59.491
  L4 w0.152: v1(91.819,58.363) 91.819,60.145 92.723,61.048 94.159,61.048 95.124,62.013 96.761,62.013 97.381,61.394 98.701,61.394 99.176,61.869 100.182,61.869 100.558,61.492 v1(100.558,61.391)
  L6 w0.152: v1(100.558,61.391) 100.567,61.391 100.669,61.492 R107B.2@100.669,62.048 ; R99B.1@100.669,60.888 v1@100.669,61.391
S4C: IC13C.55 R99C.1 R107C.2 | length 14.2
  L1 w0.127: v1(91.819,35.863) 91.834,35.878 IC13C.55@91.834,36.991
  L4 w0.152: v1(91.819,35.863) 91.819,37.645 93.049,38.874 94.177,38.874 94.79,39.488 96.471,39.488 96.871,39.089 96.958,39.001 98.901,39.001 98.952,39.052 99.255,39.052 99.571,39.369 99.967,39.369 99.979,39.357 100.194,39.357 100.558,38.992 v1(100.558,38.891)
  L6 w0.152: v1(100.558,38.891) 100.567,38.891 100.669,38.992 R107C.2@100.669,39.548 ; R99C.1@100.669,38.388 v1@100.669,38.891
S4D: IC13D.55 R99D.1 R107D.2 | length 13.1
  L1 w0.127: v1(91.819,13.363) 91.834,13.378 IC13D.55@91.834,14.491
  L4 w0.152: v1(91.819,13.363) 91.819,13.963 92.14,14.285 92.15,14.285 92.156,14.291 92.532,14.291 92.538,14.285 95.292,14.285 96.225,15.218 97.876,15.218 98.059,15.401 98.434,15.401 98.618,15.218 99.798,15.218 100.558,15.978 v1(100.558,16.391)
  L6 w0.152: v1(100.558,16.391) 100.567,16.391 100.669,16.492 R107D.2@100.669,17.048 ; R99D.1@100.669,15.888 v1@100.669,16.391
SG0: C37.1 C42.2 J2.2 NT17.1 NT18.1 NT19.1 NT20.1 R6.2 R14.2 | length 25.4
  L1 w0.3: J2.2@-1.641,15.528 -1.556,15.444 J2.2@-1.556,10.448 J2.2@3.524,10.448 ; J2.2@-1.556,15.528 J2.2@3.524,15.528 3.693,15.697 C37.1@5.859,15.697 5.859,15.935 5.914,15.991 R14.2@5.914,16.888 ; C42.2@5.894,8.338 4.844,8.338 3.888,9.295 3.888,10.085 J2.2@3.524,10.448 ; R6.2@5.894,9.418 4.612,9.418 3.582,10.448 J2.2@3.524,10.448
SG1: C11.1 C25.2 J3.2 NT1.1 NT2.1 NT3.1 NT4.1 R64.2 R156.2 TR5.6 | length 23.9
  L1 w0.25: J3.2@-1.556,78.359 3.524,78.359 5.691,78.359 5.671,78.339 R64.2@5.671,77.359 ; J3.2@-1.556,78.448 J3.2@-1.556,83.528 J3.2@3.524,83.528 5.619,83.528 C11.1@5.733,83.642
  L1 w0.298: J3.2@3.481,83.227 4.45,82.258 TR5.6@6.26,82.258
SG2: C31.1 C32.2 J4.2 NT5.1 NT6.1 NT7.1 NT8.1 R65.2 R157.2 TR4.6 | length 17.2
  L1 w0.254: J4.2@-1.556,66.528 J4.2@-1.556,61.448 J4.2@3.524,61.448 4.237,61.448 J4.2@4.371,61.314 ; R65.2@5.602,60.866 4.802,60.866 4.371,61.297 J4.2@4.371,61.314 ; C32.2@5.622,61.766 4.822,61.766 J4.2@4.371,61.314
  L1 w0.298: J4.2@3.321,66.422 3.481,66.422 4.42,65.483 TR4.6@6.179,65.483
SG3: C33.1 C34.2 J5.2 NT9.1 NT10.1 NT11.1 NT12.1 R74.2 R158.2 TR6.6 | length 24.2
  L1 w0.254: C34.2@5.708,49.53 3.764,49.53 -1.556,49.53 J5.2@-1.556,49.528 J5.2@-1.556,44.448 J5.2@3.524,44.448 3.745,44.669 C33.1@5.772,44.669 ; R74.2@5.788,43.739 C33.1@5.788,44.653
  L1 w0.298: J5.2@3.764,49.53 3.764,49.137 4.568,48.333 TR6.6@6.518,48.333
SG4: C35.1 C41.2 J6.2 NT13.1 NT14.1 NT15.1 NT16.1 R75.2 R160.2 TR7.6 | length 29.6
  L1 w0.254: J6.2@3.794,32.235 4.621,31.408 TR7.6@6.421,31.408
  L1 w0.3: R75.2@5.744,26.711 2.971,26.711 2.234,27.448 ; C35.1@5.808,32.639 J6.2@3.524,32.639 ; C41.2@5.833,27.711 2.497,27.711 2.234,27.448 ; R160.2@5.842,33.802 4.687,33.802 J6.2@3.524,32.639 ; 2.234,27.448 J6.2@-1.556,27.448 J6.2@-1.556,32.528 -1.445,32.639 J6.2@3.524,32.639
Sw_7V5: IC22.2 IC27.1 L4.1 | length 5.1
  L1 w0.254: L4.1@123.302,1.663 123.43,1.791 IC22.2@125.944,1.791
  L1 w0.5: v5(121.793,1.122) 122.686,1.122 L4.1@123.227,1.663
  L6 w0.5: v5(121.793,1.122) 121.793,1.051 121.998,0.846 IC27.1@121.998,0.442
SYNC_CLKB: IC2B.55
SYNC_CLKC: IC2C.55
SYNC_CLKD: IC2D.55
SYNC_OUTB_N: IC2B.10
SYNC_OUTB_P: IC2B.9
SYNC_OUTC_N: IC2C.10
SYNC_OUTC_P: IC2C.9
SYNC_OUTD_N: IC2D.10
SYNC_OUTD_P: IC2D.9
SYNC_SMP_ERR0: IC2A.12 IC10.D4 | length 58.8
  L1 w0.152: IC2A.12@71.944,69.841 v1(71.944,71.563) ; v1(124.453,77.35) 124.457,77.35 124.966,76.841 IC10.D4@124.97,76.841
  L4 w0.152: v1(71.944,71.563) 72.097,71.563 73.009,72.475 82.4,72.475 82.619,72.256 84.737,72.256 85.544,71.449 86.182,71.449 86.69,71.957 95.639,71.957 95.828,71.767 98.118,71.767 99.019,72.668 99.284,72.934 99.284,72.998 103.427,77.141 103.435,77.141 105.033,77.141 105.278,76.895 116.105,76.895 116.532,77.323 117.097,77.323 117.282,77.138 120.864,77.138 121.077,77.35 v1(124.453,77.35)
SYNC_SMP_ERR1: IC2B.12 IC10.J1 | length 76.3
  L1 w0.152: IC2B.12@71.944,47.341 v1(71.944,49.063) ; v1(118.223,72.112) 118.317,72.112 118.588,71.841 IC10.J1@121.97,71.841
  L3 w0.152: v1(117.334,50.541) 117.334,63.611 117.152,63.793 117.152,71.593 117.672,72.112 v1(118.223,72.112)
  L4 w0.152: v1(71.944,49.063) 71.944,49.566 72.452,50.074 77.97,50.074 77.984,50.06 82.552,50.06 82.745,49.867 83.061,49.551 84.686,49.551 85.343,48.894 86.105,48.894 86.16,48.839 86.96,48.839 87.572,49.452 95.505,49.452 95.707,49.25 96.293,49.25 96.513,49.47 96.889,49.47 97.109,49.25 101.269,49.25 102.247,50.227 105.193,50.227 105.989,51.023 110.977,51.023 111.689,50.311 117.104,50.311 v1(117.334,50.541)
SYNC_SMP_ERR2: IC2C.12 IC10.P6 | length 99.1
  L1 w0.152: IC2C.12@71.944,24.841 v1(71.944,26.563) ; v1(126.47,66.341) IC10.P6@126.97,66.841
  L3 w0.152: v1(108.338,28.277) 108.338,28.758 109.426,29.846 109.426,30.242 109.081,30.587 109.081,35.237 109.35,35.506 109.35,44.966 109.597,45.213 109.597,49.585 109.613,49.602 109.613,50.412 110.997,51.796 110.997,52.328 109.584,53.741 v1(109.584,59.791)
  L4 w0.127: v1(71.944,26.563) 71.944,27.596 72.873,28.524 76.175,28.524 77.724,30.074 82.601,30.074 83.044,29.63 83.044,29.388 83.794,28.638 84.332,28.638 84.582,28.388 84.582,28.118 84.965,27.735 85.391,27.735
  L4 w0.152: 85.391,27.735 85.632,27.735 85.873,27.977 95.51,27.977 95.688,28.154 98.122,28.154 98.608,27.668 106.475,27.668 107.072,28.265 108.326,28.265 v1(108.338,28.277) ; v1(109.584,59.791) 109.655,59.72 125.081,59.72 126.16,60.799 126.16,62.355 126.613,62.808 126.613,63.183 126.47,63.326 v1(126.47,66.341)
SYNC_SMP_ERR3: IC2D.12 IC10.N6 | length 120.1
  L1 w0.152: IC2D.12@71.944,2.341 v1(71.944,4.063) ; v1@126.545,67.46 126.926,67.841 IC10.N6@126.97,67.841
  L3 w0.152: v1(104.444,4.738) 104.444,7.436 105.591,8.583 105.591,18.946 105.144,19.393 105.144,20.02 104.986,20.178 104.986,20.553 104.986,20.686 104.986,21.061 105.144,21.219 105.144,37.241 105.694,37.791 105.694,38.764 106.296,39.366 106.364,39.366 107.141,40.143 107.141,40.841 107.75,41.45 107.75,41.72 107.738,41.732 107.738,47.743 107.726,47.755 107.726,49.246 108.076,49.597 108.076,53.585 106.834,54.827 106.834,56.855 107.074,57.095 107.074,57.892 106.834,58.132 v1(106.834,59.096)
  L4 w0.152: v1(71.944,4.063) 71.944,4.566 72.436,5.058 77.074,5.058 77.119,5.013 77.515,5.013 77.56,5.058 82.279,5.058 82.594,4.743 82.99,4.743 83.305,5.058 86.03,5.058 86.439,4.648 94.463,4.648 94.844,4.267 96.114,4.267 96.139,4.292 96.214,4.292 96.442,4.521 104.227,4.521 v1(104.444,4.738) ; v1(106.834,59.096) 107.325,59.587 108.219,59.587 108.876,60.244 109.807,60.244 110.032,60.019 124.818,60.019 125.881,61.082 125.881,62.439 125.707,62.613 125.707,63.183 126.017,63.493 126.017,66.863 v1(126.445,67.291)
TP0: IC10.A4 TP0.1 | length 14
  L1 w0.152: TP0.1@115.824,87.173 118.08,84.916 123.068,84.916 123.448,84.537 123.448,83.84 124.97,82.317 IC10.A4@124.97,79.841
TP1: IC10.A5 TP1.1 | length 12.6
  L1 w0.152: TP1.1@117.944,87.188 119.936,85.196 123.184,85.196 123.727,84.652 123.727,83.955 125.249,82.433 125.249,80.561 IC10.A5@125.97,79.841
TP2: IC10.B5 TP2.1 | length 12
  L1 w0.152: TP2.1@120.117,87.198 121.84,85.475 123.299,85.475 124.006,84.768 124.006,84.071 125.691,82.387 125.691,81.624 126.398,80.916 126.398,79.269 IC10.B5@125.97,78.841
TP3: IC10.A6 TP3.1 | length 9.3
  L1 w0.152: TP3.1@122.301,87.198 124.286,85.213 124.286,84.401 125.97,82.717 125.97,82.225 126.97,81.225 IC10.A6@126.97,79.841
TP4: IC10.A7 TP4.1 | length 9.1
  L1 w0.127: TP4.1@124.622,87.188 125.554,86.257 125.91,86.257 126.122,86.045 126.398,86.045 126.796,85.646 126.796,83.297 127.97,82.123 127.97,80.288
  L1 w0.152: IC10.A7@127.97,79.841 127.97,80.288
Ver_AD9910: IC10.A15 R148.1 R149.2 | length 8.3
  L1 w0.152: IC10.A15@135.97,79.841 135.97,82.066 137.134,83.23 137.134,85.374 136.862,85.646 136.259,85.646 136.02,85.885 R148.1@136.02,86.875
pads on no net: FTG1.FTG2 FTG2.1 FTG3.1 FTG4.1 IC1A.17 IC1A.44 IC1B.17 IC1B.44 IC2A.1 IC2A.20 IC2A.24 IC2A.40 IC2A.72 IC2A.86 IC2A.87 IC2A.93 IC2A.94 IC2A.97 IC2A.98 IC2A.99 IC2A.100 IC2A.FTG1 IC2A.FTG2 IC2B.1 IC2B.20 IC2B.24 IC2B.40 IC2B.72 IC2B.86 IC2B.87 IC2B.93 IC2B.94 IC2B.97 IC2B.98 IC2B.99 IC2B.100 IC2B.FTG1 IC2B.FTG2 IC2C.1 IC2C.20 IC2C.24 IC2C.40 IC2C.72 IC2C.86 IC2C.87 IC2C.93 IC2C.94 IC2C.97 IC2C.98 IC2C.99 IC2C.100 IC2C.FTG1 IC2C.FTG2 IC2D.1 IC2D.20 IC2D.24 IC2D.40 IC2D.72 IC2D.86 IC2D.87 IC2D.93 IC2D.94 IC2D.97 IC2D.98 IC2D.99 IC2D.100 IC2D.FTG1 IC2D.FTG2 IC6A.17 IC6A.44 IC6B.17 IC6B.44 IC7.2 IC7.3 IC7.4 IC7.13 IC7.14 IC7.15 IC7.17 IC8A.5 IC8B.5 IC9.17 IC9.29 IC9.30 IC10.A1 IC10.B12 IC10.C1 IC10.C2 IC10.C5 IC10.C6 IC10.C15 IC10.D1 IC10.D6 IC10.D14 IC10.D16 IC10.E1 IC10.E6 IC10.E7 IC10.E12 IC10.F1 IC10.F3 IC10.F12 IC10.F13 IC10.F14 IC10.F15 IC10.G1 IC10.G2 IC10.G11 IC10.G12 IC10.G13 IC10.G14 IC10.G15 IC10.G16 IC10.H12 IC10.H13 IC10.H14 IC10.H15 IC10.H16 IC10.J12 IC10.J13 IC10.J14 IC10.J15 IC10.J16 IC10.K12 IC10.K14 IC10.K16 IC10.L3 IC10.L12 IC10.L13 IC10.L14 IC10.M4 IC10.M9 IC10.M10 IC10.M11 IC10.M12 IC10.M13 IC10.M14 IC10.N8 IC10.N10 IC10.N11 IC10.P9 IC10.P10 IC10.P11 IC10.P13 IC10.P14 IC10.T6 IC10.T9 IC10.T11 IC10.T12 IC10.T13 IC10.T14 IC11.2 IC11.3 IC11.4 IC11.13 IC11.14 IC11.15 IC11.17 IC13A.12 IC13A.13 IC13A.15 IC13A.16 IC13A.17 IC13A.18 IC13A.20 IC13A.21 IC13A.22 IC13A.34 IC13A.35 IC13A.38 IC13A.40 IC13A.41 IC13B.12 IC13B.13 IC13B.15 IC13B.16 IC13B.17 IC13B.18 IC13B.20 IC13B.21 IC13B.22 IC13B.34 IC13B.35 IC13B.38 IC13B.40 IC13B.41 IC13C.12 IC13C.13 IC13C.15 IC13C.16 IC13C.17 IC13C.18 IC13C.20 IC13C.21 IC13C.22 IC13C.34 IC13C.35 IC13C.38 IC13C.40 IC13C.41 IC13D.12 IC13D.13 IC13D.15 IC13D.16 IC13D.17 IC13D.18 IC13D.20 IC13D.21 IC13D.22 IC13D.34 IC13D.35 IC13D.38 IC13D.40 IC13D.41 IC14.4 IC18.2 IC18.3 IC18.4 IC18.13 IC18.14 IC18.15 IC18.17 IC19.11 IC19.13 IC19.21 IC19.24 IC19.25 IC19.28 IC19.40 IC19.41 IC21.4 IC23A.4 IC23A.6 IC23A.7 IC23A.8 IC23A.13 IC23A.14 IC23A.15 IC23A.16 IC23B.4 IC23B.6 IC23B.7 IC23B.8 IC23B.13 IC23B.14 IC23B.15 IC23B.16 IC23C.4 IC23C.6 IC23C.7 IC23C.8 IC23C.13 IC23C.14 IC23C.15 IC23C.16 IC23D.4 IC23D.6 IC23D.7 IC23D.8 IC23D.13 IC23D.14 IC23D.15 IC23D.16 IC24.8 IC24.11 IC24.12 IC24.13 IC24.14 IC24.15 IC24.16 IC26A.1 IC26A.2 IC26A.3 IC26A.7 IC26B.1 IC26B.2 IC26B.3 IC26B.7 J8.12 J8.14 J8.15 J8.16 J10.3 J10.4 J10.5 J10.6 J10.9 J10.10 J10.11 J10.12 J10.16 J10.18 J10.P1 J10.P2 L1A.2 L1A.4 L1B.2 L1B.4 L1C.2 L1C.4 L1D.2 L1D.4 TR4.2 TR5.2 TR6.2 TR7.2

## Polygon pours and split planes (outlines as drawn)
no net on L4 "balancing" (solid, pour order 372): -3.28,94.116 155.587,94.116 155.587,-5.173 -3.28,-5.173 -3.28,3.236 -5.556,5.512 -5.556,84.421 -3.28,86.697
P3V3 on L4 "P3V3_L04_P142" (solid, remove dead copper, pour order 142): 121.239,58.016 154.689,58.016 154.689,18.446 116.144,18.446 116.144,52.921
P12V0 on L4 "L4-P12V0" (solid, remove dead copper, pour order 362): 20 vertices, not listed, extent 119.528,-2.489 154.858,18.249
P3V3A on L4 "P3V3A_L04_P082" (solid, remove dead copper, pour order 82): 102.918,18.428 101.569,18.428 101.4,19.375 100.479,20.645 96.574,20.645 95.619,19.375 91.511,19.375 91.062,19.125 54.223,19.126 54.223,25.146 99.822,25.146 102.918,22.05
P1V8D on L4 "NONET_L-01_P-001" (solid, remove dead copper, pour order 354): 18 vertices, not listed, extent 122.806,67.029 143.395,77.653
P1V8A on L4 "Top-No Net" (solid, remove dead copper, pour order 252): 101.694,18.428 101.19,18.428 98.676,15.914 83.694,15.914 83.694,18.939 91.084,18.939 95.996,19.197 96.574,20.365 100.384,20.387 101.19,19.406
P3V3_DRVD on L4 "Top-No Net" (solid, remove dead copper, pour order 250): 84.944,5.738 93.584,5.738 95.149,7.303 95.584,7.738 95.584,8.738 95.584,9.378 87.944,9.378 87.944,8.738 87.944,8.641 87.805,8.502 87.791,8.488 87.194,8.488 85.775,8.488 85.194,7.907 84.944,7.657
P1V8A on L4 "Top-No Net" (solid, remove dead copper, pour order 248): 101.694,40.928 92.634,40.928 92.194,40.488 91.844,40.138 90.194,40.138 85.094,40.138 84.944,39.988 84.803,39.848 84.194,39.848 83.694,39.848 83.694,43.693 101.694,43.693
P3V3_DRVC on L4 "Top-No Net" (solid, remove dead copper, pour order 246): 84.944,28.238 93.584,28.238 95.149,29.803 95.584,30.238 95.584,31.238 95.584,31.873 88.676,31.873 87.944,31.141 87.805,31.002 87.791,30.988 87.194,30.988 85.775,30.988 85.194,30.407 84.944,30.157
P1V8A on L4 "Top-No Net" (solid, remove dead copper, pour order 244): 101.694,85.928 92.634,85.928 92.194,85.488 91.844,85.138 90.194,85.138 85.094,85.138 84.944,84.988 84.803,84.848 84.194,84.848 83.694,84.848 83.694,87.554 92.26,87.554 93.245,88.539 101.694,88.539
P3V3_DRVA on L4 "Top-No Net" (solid, remove dead copper, pour order 242): 84.944,73.238 93.584,73.238 95.149,74.803 95.584,75.238 95.584,76.238 95.584,76.873 87.944,76.873 87.944,76.238 87.944,76.141 87.805,76.002 87.791,75.988 87.194,75.988 85.775,75.988 85.194,75.407 84.944,75.157
P3V3_DRVB on L4 "Top-No Net" (solid, remove dead copper, pour order 178): 84.944,50.738 93.584,50.738 95.149,52.303 95.584,52.738 95.584,53.738 95.584,54.26 87.944,54.26 87.944,53.738 87.944,53.641 87.805,53.502 87.791,53.488 87.194,53.488 85.775,53.488 85.194,52.907 84.944,52.657
P1V8A on L4 "Top-No Net" (solid, remove dead copper, pour order 172): 101.694,63.428 92.634,63.428 92.194,62.988 91.844,62.638 90.194,62.638 85.094,62.638 84.944,62.488 84.803,62.348 84.194,62.348 83.694,62.348 83.694,66.187 101.694,66.187
GND on L3 "NONET_L-01_P-001" (solid, remove dead copper, pour order 366): -3.28,92.338 155.87,92.338 155.87,-3.237 -3.28,-3.237 -3.28,2.532 -5.231,4.483 -5.231,84.188 -3.28,86.139
P3V3 on L3 "Top-No Net" (solid, remove dead copper, pour order 312): 118.694,8.988 118.694,20.738 118.194,20.738 115.944,22.988 115.944,30.238 119.194,30.238 119.194,26.334 125.606,26.334 126.348,25.593 126.348,8.988
P1V8A on L3 "P1V8A_L03_P140" (solid, remove dead copper, pour order 140): 100.473,11.738 101.714,11.738 102.014,12.038 102.473,12.497 106.528,16.552 106.528,85.194 103.223,88.499 103.131,88.59 102.223,88.59 100.064,88.59 99.723,88.249 97.993,86.519 97.993,13.978 100.223,11.749 100.233,11.738
NetC91_2 on L3 "L3-NetC91_2" (solid, remove dead copper, pour order 346): 107.75,36.288 108.738,36.288 109.452,37.002 109.452,40.254 109.452,49.017 109.185,49.283 108.526,49.283 108.08,48.838 108.08,40.812 107.588,40.321 107.588,36.408 107.73,36.266
P3V6 on L3 "Top-No Net" (solid, remove dead copper, pour order 310): 28 vertices, not listed, extent 112.944,-2.012 132.53,9.238
P5V0A on L3 "P5V0A_L03_P070" (solid, remove dead copper, pour order 70): 16.973,72.749 17.973,72.749 18.223,72.499 18.223,71.499 18.223,14.499 33.324,14.499 33.324,12.499 16.723,12.499 16.723,15.749 16.723,72.499
NetC73_2 on L3 "Top-No Net" (solid, remove dead copper, pour order 308): 133.325,3.988 135.565,0.488 141.825,0.488 141.825,3.683 137.199,3.705 137.25,6.238 133.325,6.238
P3V3A on L3 "P3V3A_L03_P086" (solid, remove dead copper, pour order 86): 94.973,19.05 95.723,19.05 97.917,21.244 97.917,86.335 96.763,87.488 95.223,87.488 94.573,87.488 94.473,87.388 94.473,86.8 94.473,19.3 94.723,19.05
P3V3A on L3 "P3V3A_L03_P088" (solid, remove dead copper, pour order 88): 104.8,35.791 104.8,16.171 105.694,15.277 105.694,1.988 111.944,1.988 111.944,5.988 107.694,5.988 107.694,35.791
P3V3_DRVD on L3 "Top-No Net" (solid, remove dead copper, pour order 290): 17 vertices, not listed, extent 91.694,7.988 95.326,18.488
P1V8A on L3 "Top-No Net" (solid, remove dead copper, pour order 272): 85.194,18.988 85.194,10.738 85.194,3.195 84.694,2.695 84.651,2.738 83.264,2.738 83.264,2.788 82.814,3.238 82.694,3.358 82.694,4.918 82.694,18.738 83.194,19.238 84.694,19.238 84.944,19.238 85.194,18.988
P1V8A on L3 "Top-No Net" (solid, remove dead copper, pour order 238): 85.194,41.488 85.194,33.238 85.194,25.695 84.694,25.195 84.651,25.238 83.264,25.238 83.264,25.288 82.814,25.738 82.694,25.858 82.694,27.418 82.694,41.238 83.194,41.738 84.694,41.738 84.944,41.738 85.194,41.488
P1V8A on L3 "Top-No Net" (solid, remove dead copper, pour order 236): 85.194,86.488 85.194,78.238 85.194,70.695 84.694,70.195 84.651,70.238 83.264,70.238 83.264,70.288 82.814,70.738 82.694,70.858 82.694,72.418 82.694,86.238 83.194,86.738 84.694,86.738 84.944,86.738 85.194,86.488
P1V8A on L3 "Top-No Net" (solid, remove dead copper, pour order 174): 85.194,63.988 85.194,55.738 85.194,48.195 84.694,47.695 84.651,47.738 83.264,47.738 83.264,47.788 82.814,48.238 82.694,48.358 82.694,49.918 82.694,63.738 83.194,64.238 84.694,64.238 84.944,64.238 85.194,63.988
P3V3A on L3 "P3V3A_L03_P084" (solid, remove dead copper, pour order 84): 59.473,14.749 60.897,14.749 63.398,14.749 63.398,81.073 60.723,83.749 59.723,83.749 59.473,83.749 59.223,83.499 59.223,82.999 59.223,14.999
P7V0A on L3 "P7V0A_L03_P052" (solid, remove dead copper, pour order 52): 24.744,73.388 26.044,73.388 26.544,72.888 26.544,71.388 26.544,15.749 24.544,15.749 24.544,19.388 24.544,19.888 24.544,72.888 24.544,73.388
P3V3_DRVA on L3 "Top-No Net" (solid, remove dead copper, pour order 284): 22 vertices, not listed, extent 91.694,75.488 94.997,85.988
P3V3_DRVB on L3 "Top-No Net" (solid, remove dead copper, pour order 286): 21 vertices, not listed, extent 91.694,52.988 94.997,63.888
P3V3_DRVC on L3 "Top-No Net" (solid, remove dead copper, pour order 288): 21 vertices, not listed, extent 91.694,30.488 94.997,41.313
no net on L1 "balancing_top" (solid, pour order 368): -3.204,91.491 156.212,91.491 156.212,-3.448 -3.166,-3.371 -3.314,3.569 -5.556,5.665 -5.556,84.536 -3.314,86.778
P3V3 on L1 "P3V3_L01_P306" (solid, remove dead copper, pour order 306): 32 vertices, not listed, extent 111.56,7.888 128.857,52.841
NetC161_2 on L1 "NONET_L-01_P-001" (solid, remove dead copper, pour order 322): 18 vertices, not listed, extent 120.944,4.791 141.694,59.041
P1V8_CLK_VDDC on L1 "Top-No Net" (solid, remove dead copper, pour order 148): 65.444,33.238 65.444,25.541 69.194,25.541 69.194,27.738 69.194,31.238 68.194,32.238 67.194,33.238 65.444,33.238
P1V8_CLK_VDDD on L1 "Top-No Net" (solid, remove dead copper, pour order 150): 65.444,10.738 65.444,3.041 69.194,3.041 69.194,5.238 69.194,8.738 68.194,9.738 67.194,10.738 65.444,10.738
P7V5 on L1 "P7V5_L01_P128" (solid, remove dead copper, pour order 128): 112.77,4.711 119.808,4.711 119.808,-2.489 115.296,-2.489 112.77,0.159
P7V5A on L1 "P7V5A_L01_P076" (solid, remove dead copper, pour order 76): 31 vertices, not listed, extent 102.223,-2.501 113.223,4.499
P3V6 on L1 "P3V6_L01_P058" (solid, remove dead copper, pour order 58): 28 vertices, not listed, extent 113.044,0.526 134.911,11.221
SG0 on L1 "Top-No Net" (solid, remove dead copper, pour order 298): 5.944,16.488 5.944,7.988 -3.556,7.988 -3.556,17.488 5.944,17.488
SG4 on L1 "Top-No Net" (solid, remove dead copper, pour order 296): 5.965,33.638 5.965,25.638 -3.556,25.638 -3.556,34.638 5.965,34.638
SG3 on L1 "Top-No Net" (solid, remove dead copper, pour order 294): 5.944,50.488 5.944,42.488 -3.556,42.488 -3.556,51.488 5.944,51.488
SG2 on L1 "Top-No Net" (solid, remove dead copper, pour order 292): 5.944,67.488 5.944,59.488 -3.556,59.488 -3.556,68.488 5.944,68.488
SG1 on L1 "Top-No Net" (solid, remove dead copper, pour order 280): 5.944,84.488 5.944,76.488 -3.268,76.488 -3.268,85.089 -3.268,85.488 5.944,85.488
P7V0A on L1 "P7V0A_L01_P068" (solid, remove dead copper, pour order 68): 19.223,7.749 23.194,7.749 23.694,8.249 23.633,8.31 23.633,10.588 23.633,10.647 24.034,11.048 24.235,11.249 26.444,11.249 27.223,11.249 27.223,16.999 23.223,16.999 22.223,15.999 18.973,12.749 18.973,7.999
P12V0 on L1 "P12V0_L01_P100" (solid, remove dead copper, pour order 100): 35 vertices, not listed, extent 141.673,-1.653 153.194,18.524
P7V5A on L1 "P7V5A_L01_P072" (solid, remove dead copper, pour order 72): 19 vertices, not listed, extent 23.473,4.249 32.973,9.999
P2V1 on L1 "P2V1_L01_P054" (solid, remove dead copper, pour order 54): 104.221,81.888 116.219,81.888 116.219,73.646 116.219,61.849 119.027,59.041 119.907,59.041 119.907,52.941 113.182,52.941 104.221,61.902
NetC73_2 on L1 "NETC73_2_L01_P106" (solid, remove dead copper, pour order 106): 18 vertices, not listed, extent 133.553,-2.531 141.807,9.056
GND on L1 "Top-No Net" (solid, remove dead copper, pour order 274): 86.719,82.038 86.766,81.991 95.572,81.991 95.459,81.878 95.459,73.091 95.414,73.046 86.665,73.046
P1V8_CLK_VDDA on L1 "Top-No Net" (solid, remove dead copper, pour order 194): 29 vertices, not listed, extent 90.194,67.538 101.989,74.238
P1V8_DVDDA on L1 "Top-No Net" (solid, remove dead copper, pour order 184): 27 vertices, not listed, extent 71.944,83.438 90.764,88.888
P1V8_DVDDD on L1 "Top-No Net" (solid, remove dead copper, pour order 222): 22 vertices, not listed, extent 71.694,5.431 81.944,18.488
P1V8_CLK_VDDC on L1 "Top-No Net" (solid, remove dead copper, pour order 212): 29 vertices, not listed, extent 90.194,22.538 101.989,29.238
P3V3A on L1 "Top-No Net" (solid, remove dead copper, pour order 320): 26 vertices, not listed, extent 100.694,4.238 112.694,19.999
P3V3_DRVD on L1 "Top-No Net" (solid, remove dead copper, pour order 224): 23 vertices, not listed, extent 70.966,-0.571 84.716,16.734
P1V8_DVDDC on L1 "Top-No Net" (solid, remove dead copper, pour order 204): 22 vertices, not listed, extent 71.694,27.931 81.944,40.988
P3V3_DRVC on L1 "Top-No Net" (solid, remove dead copper, pour order 206): 24 vertices, not listed, extent 70.944,21.887 84.694,39.191
P1V8_DVDDB on L1 "Top-No Net" (solid, remove dead copper, pour order 170): 27 vertices, not listed, extent 71.944,60.938 90.764,66.388
P1V8_DVDDB on L1 "Top-No Net" (solid, remove dead copper, pour order 166): 22 vertices, not listed, extent 71.694,50.431 81.944,63.488
P3V3_DACA on L1 "Top-No Net" (solid, remove dead copper, pour order 190): 93.734,84.641 93.694,84.601 93.694,80.738 93.694,80.277 93.973,79.999 93.983,79.988 96.334,79.988 97.184,79.988 97.234,80.038 97.434,80.238 101.694,80.238 101.694,82.136 98.721,85.11 96.944,85.11 94.203,85.11
P1V8_DVDDD on L1 "Top-No Net" (solid, remove dead copper, pour order 218): 27 vertices, not listed, extent 71.944,15.938 90.764,21.388
P1V8_DVDDC on L1 "Top-No Net" (solid, remove dead copper, pour order 200): 27 vertices, not listed, extent 71.944,38.438 90.764,43.888
P1V8_DVDDA on L1 "Top-No Net" (solid, remove dead copper, pour order 186): 22 vertices, not listed, extent 71.694,72.931 81.944,85.988
GND on L1 "GND_L01_P112" (solid, remove dead copper, pour order 112): 128.927,0.288 134.472,0.288 135.106,-0.346 135.133,-0.373 135.133,-1.462 135.133,-2.684 135.106,-2.712 128.106,-2.712 128.106,-0.533
P3V3_DACD on L1 "Top-No Net" (solid, remove dead copper, pour order 226): 19 vertices, not listed, extent 93.694,12.488 101.694,19.238
P3V3_DACD on L1 "Top-No Net" (solid, remove dead copper, pour order 228): 60.294,16.488 64.194,16.488 64.194,12.238 68.194,12.238 68.194,17.738 61.194,17.738 60.244,17.738 60.202,17.696 60.194,17.688 60.194,16.738 60.194,16.588 60.294,16.488
GND on L1 "Top-No Net" (solid, remove dead copper, pour order 220): 27 vertices, not listed, extent 65.694,4.738 77.444,16.738
P1V8A on L1 "Top-No Net" (solid, remove dead copper, pour order 214): 28 vertices, not listed, extent 83.588,0.238 90.194,3.891
P3V3_DACC on L1 "Top-No Net" (solid, remove dead copper, pour order 210): 60.294,38.988 64.194,38.988 64.194,34.738 68.194,34.738 68.194,40.238 61.194,40.238 60.244,40.238 60.202,40.196 60.194,40.188 60.194,39.238 60.194,39.088 60.294,38.988
P3V3_DACC on L1 "Top-No Net" (solid, remove dead copper, pour order 208): 19 vertices, not listed, extent 93.694,34.988 101.694,41.738
GND on L1 "Top-No Net" (solid, remove dead copper, pour order 202): 27 vertices, not listed, extent 65.694,27.238 77.444,39.238
P1V8A on L1 "Top-No Net" (solid, remove dead copper, pour order 198): 28 vertices, not listed, extent 83.588,22.738 90.194,26.391
P3V3_DACA on L1 "Top-No Net" (solid, remove dead copper, pour order 192): 60.294,83.988 64.194,83.988 64.194,79.738 68.194,79.738 68.194,85.238 61.194,85.238 60.244,85.238 60.202,85.196 60.194,85.188 60.194,84.238 60.194,84.088 60.294,83.988
GND on L1 "Top-No Net" (solid, remove dead copper, pour order 348): 27 vertices, not listed, extent 65.694,72.238 77.444,84.238